# Altium PCB EMG-Arm-ELEC-V1.0.PcbDoc (part 3 of 5)
Units mil, origin at the board's own origin, x right, y up, seen from the top; angles counter-clockwise.
Board outline 8303.83 x 7532.25 mil, 2 copper layers (Top Layer, Bottom Layer), stack 3.556 mil thick; 303 components, 183 nets, 804 pads, 233 vias.
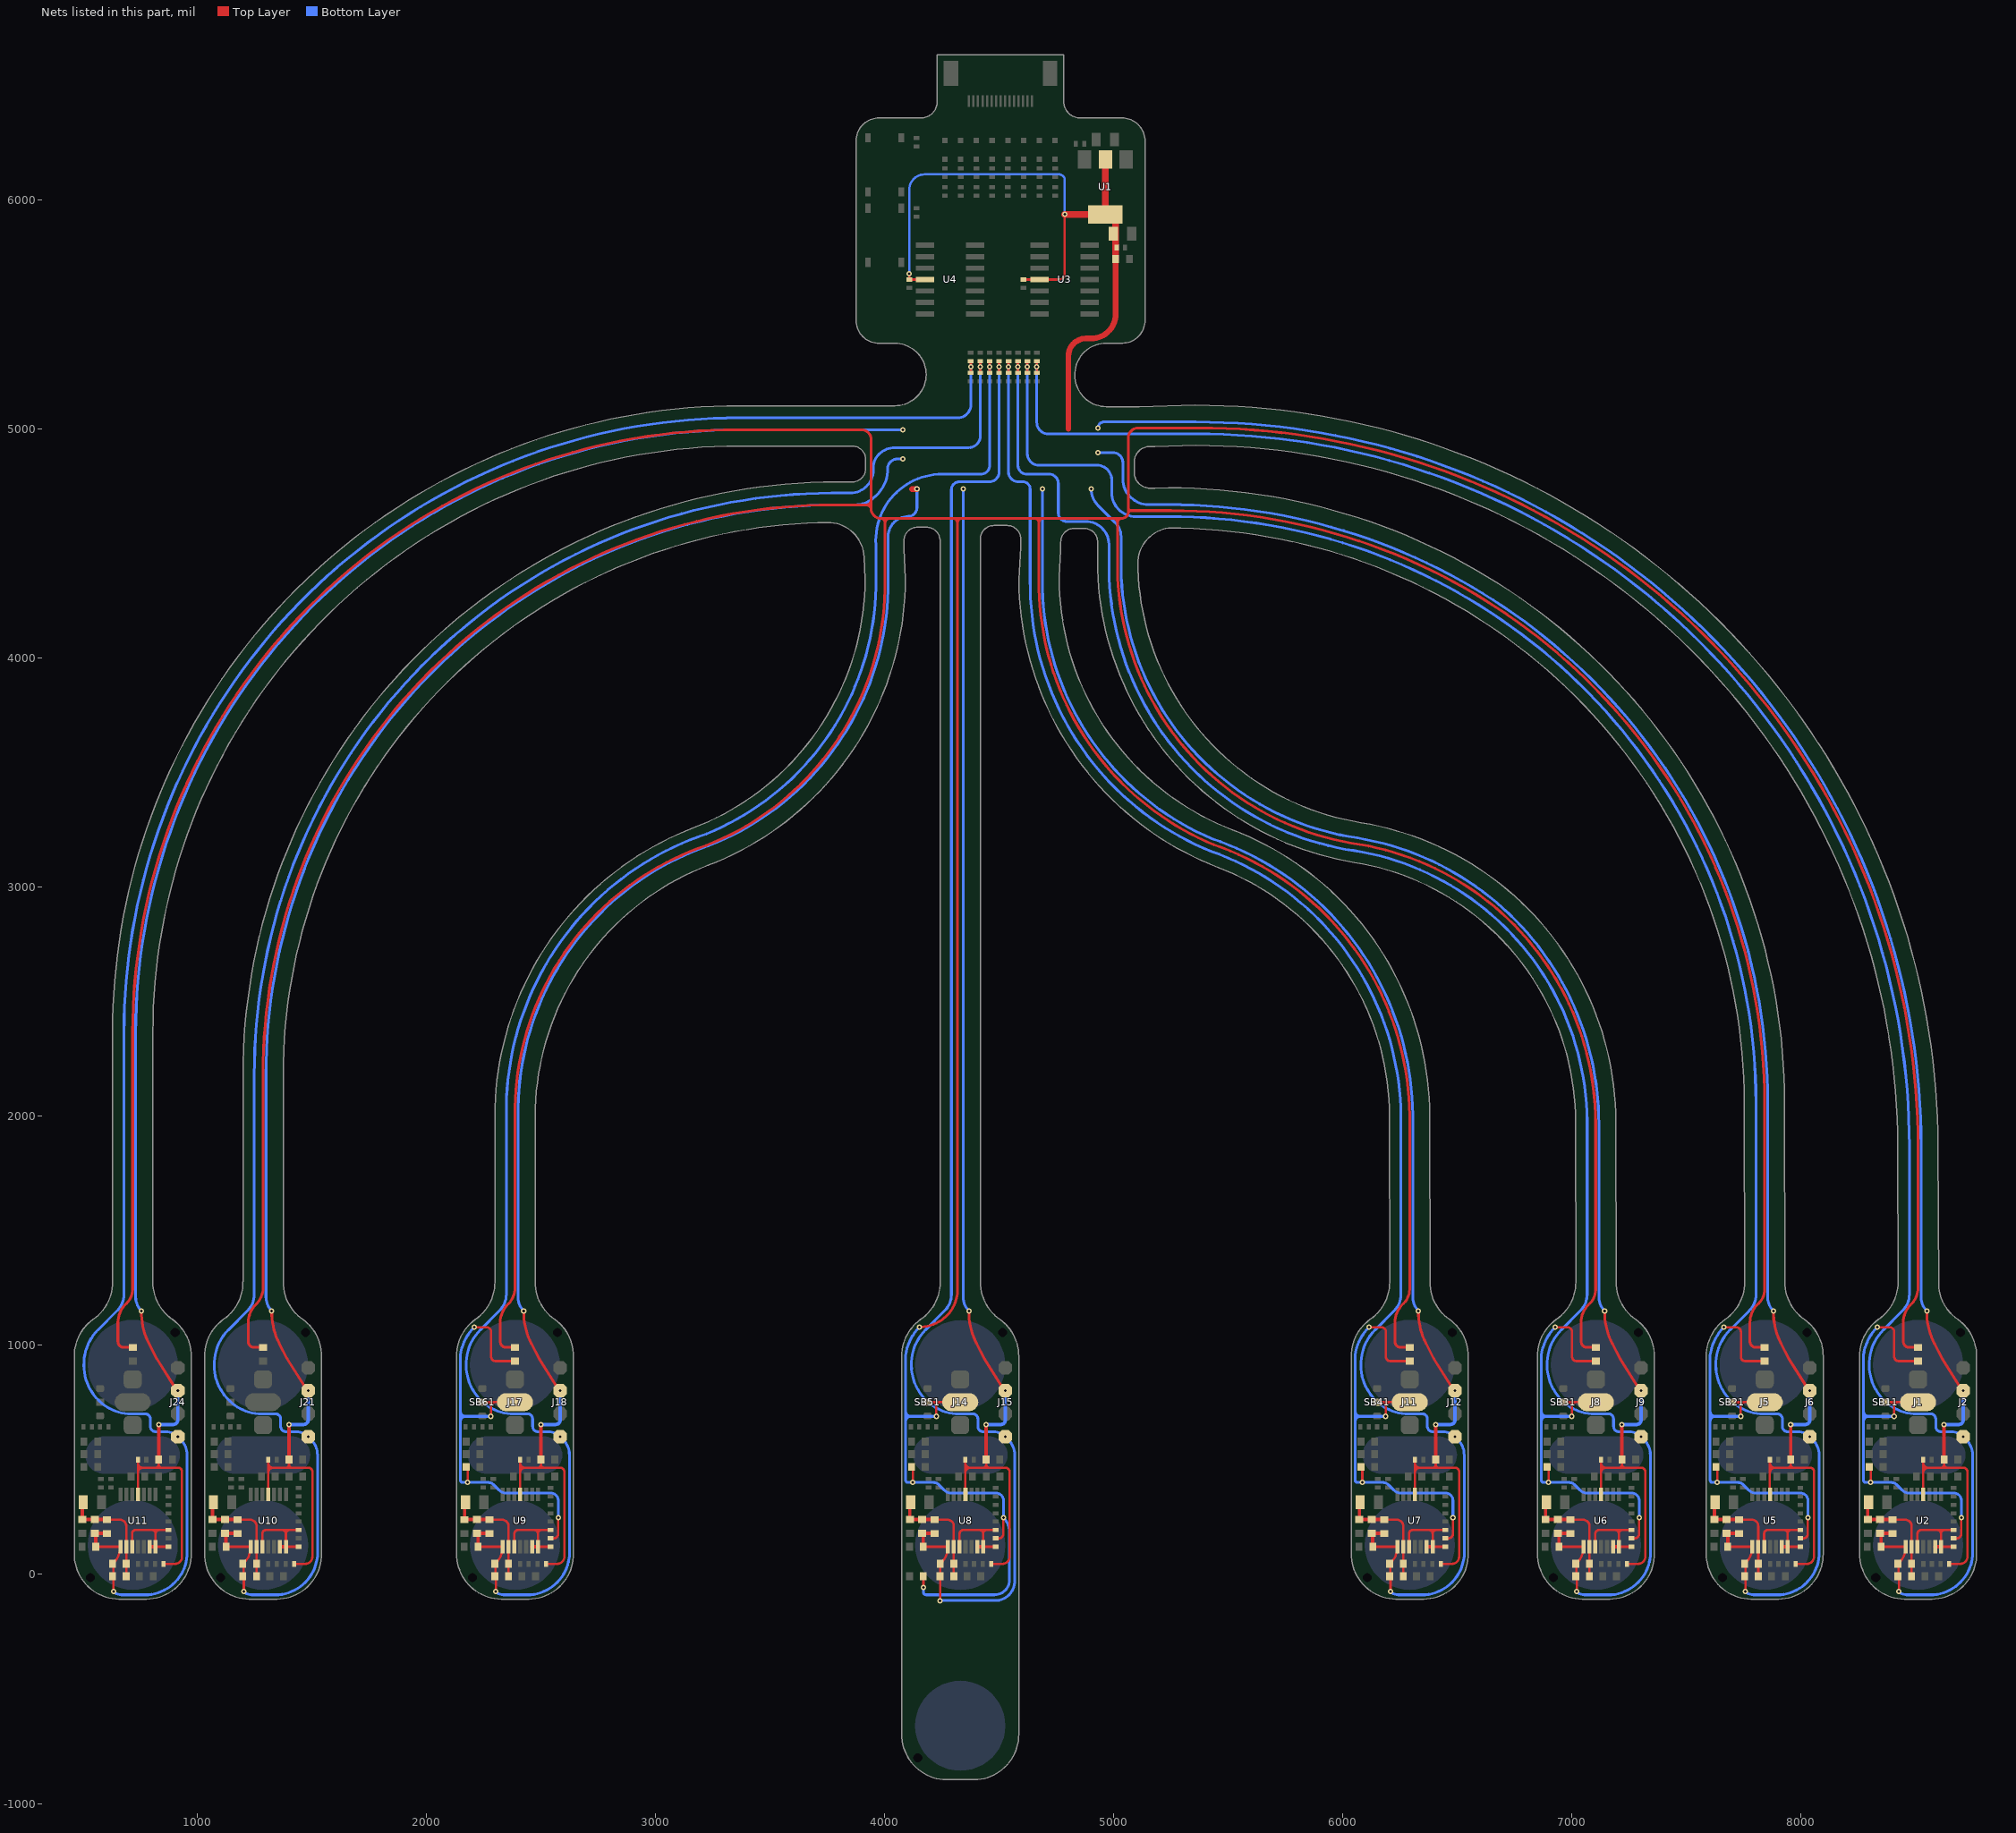
[diagram p2: the nets of this part, all layers, seen from the top]

## Via types
v1: diameter 23.62, hole 11.81, Top Layer to Bottom Layer, tented both sides, 233 vias

## Nets (pads, with @x,y where several pads share a name; then routed paths per layer and width w, separated by ;. In a path a pad name is that pad's centre, name@x,y a point inside that pad or via, vN(x,y) a via of type N, cw(c..) or ccw(c..) an arc to the next point about the centre after c; other vN are vias at no path point)
5V: C1.1 C2.2 C5.2 C6.2 C13.1 C14.1 C15.1 C16.2 C17.2 C24.2 C25.2 C32.2 C33.2 C40.2 C41.2 C48.2 C49.2 C56.2 C57.2 C64.2 C65.2 J2.3 J6.3 J9.3 J12.3 J15.3 J18.3 J21.3 J24.3 R11.2 R34.2 R47.1 R60.1 R73.2 R86.2 R99.2 R112.2 U1.2 U1.4 U2.4 U3.4 U4.4 U5.4 U6.4 U7.4 U8.4 U9.4 U10.4 U11.4 | length 57313.3
  Top Layer w10: C64.2@742.15,501.23 742.15,485.86 ; 742.22,465.79 762.22,465.79 ; U11.4@742.65,349.35 cw(c743.86,350.55) 742.15,350.55 742.15,445.73 ; C65.2@833.09,501.23 833.09,479.45 ; R112.2@854.73,46.32 903.73,46.32 ccw(c903.73,77.54) 934.95,77.54 934.95,449.23 ccw(c918.38,449.23) 918.38,465.79 846.75,465.79 ; C56.2@1311.13,501.23 1311.13,485.86 ; 1311.2,465.79 1331.2,465.79 ; U10.4@1311.63,349.35 cw(c1312.84,350.55) 1311.13,350.55 1311.13,445.73 ; C57.2@1402.06,501.23 1402.06,479.45 ; R99.2@1423.71,46.32 1472.71,46.32 ccw(c1472.71,77.54) 1503.93,77.54 1503.93,449.23 ccw(c1487.36,449.23) 1487.36,465.79 1415.72,465.79 ; C48.2@2410.91,501.23 2410.91,485.86 ; 2410.98,465.79 2430.98,465.79 ; U9.4@2411.41,349.35 cw(c2412.62,350.55) 2410.91,350.55 2410.91,445.73 ; C49.2@2501.85,501.23 2501.85,479.45 ; R86.2@2523.49,46.32 2572.49,46.32 ccw(c2572.49,77.54) 2603.71,77.54 2603.71,449.23 ccw(c2587.14,449.23) 2587.14,465.79 2515.51,465.79 ; v1(4108.98,5679) C15.1@4108.98,5653.82 U4.4@4178.96,5653.82 ; C40.2@4354.4,501.23 4354.4,485.86 ; 4354.47,465.79 4374.47,465.79 ; U8.4@4354.9,349.35 cw(c4356.11,350.55) 4354.4,350.55 4354.4,445.73 ; C41.2@4445.33,501.23 4445.33,479.45 ; R73.2@4466.97,46.32 4515.97,46.32 ccw(c4515.97,77.54) 4547.2,77.54 4547.2,449.23 ccw(c4530.63,449.23) 4530.63,465.79 4458.99,465.79 ; C14.1@4607.02,5653.82 U3.4@4677.98,5653.82 4764.82,5653.82 ccw(c4764.82,5676.99) 4788,5676.99 v1(4788,5937.99) ; C32.2@6316.56,501.23 6316.56,485.86 ; 6316.63,465.79 6336.63,465.79 ; U7.4@6317.06,349.35 cw(c6318.27,350.55) 6316.56,350.55 6316.56,445.73 ; C33.2@6407.49,501.23 6407.49,479.45 ; R60.1@6429.14,46.32 6478.14,46.32 ccw(c6478.14,77.54) 6509.36,77.54 6509.36,449.23 ccw(c6492.79,449.23) 6492.79,465.79 6421.15,465.79 ; C24.2@7129.28,501.22 7129.28,485.86 ; 7129.34,465.79 7149.34,465.79 ; U6.4@7129.78,349.34 cw(c7130.98,350.55) 7129.28,350.55 7129.28,445.72 ; C25.2@7220.21,501.22 7220.21,479.45 ; R47.1@7241.85,46.31 7290.85,46.31 ccw(c7290.85,77.53) 7322.07,77.53 7322.07,449.22 ccw(c7305.5,449.22) 7305.5,465.79 7233.87,465.79 ; C16.2@7866.02,501.23 7866.02,485.86 ; 7866.09,465.79 7886.09,465.79 ; U5.4@7866.52,349.35 cw(c7867.73,350.55) 7866.02,350.55 7866.02,445.73 ; C17.2@7956.96,501.23 7956.96,479.45 ; R34.2@7978.6,46.32 8027.6,46.32 ccw(c8027.6,77.54) 8058.82,77.54 8058.82,449.23 ccw(c8042.25,449.23) 8042.25,465.79 7970.62,465.79 ; C5.2@8535.5,501.22 8535.5,485.86 ; 8535.57,465.79 8555.57,465.79 ; U2.4@8536,349.35 cw(c8537.21,350.55) 8535.5,350.55 8535.5,445.72 ; C6.2@8626.43,501.22 8626.43,479.45 ; R11.2@8648.07,46.32 8697.08,46.32 ccw(c8697.08,77.54) 8728.3,77.54 8728.3,449.22 ccw(c8711.73,449.22) 8711.73,465.79 8640.09,465.79 ; 742.15,445.73 cw(c762.22,445.73) 762.22,465.79 ; 742.15,445.73 742.15,485.86 ; 742.15,485.86 ccw(c762.22,485.86) 762.22,465.79 ; 762.22,465.79 819.43,465.79 ; 819.43,465.79 ccw(c819.43,479.45) 833.09,479.45 ; 819.43,465.79 846.75,465.79 ; 833.09,479.45 ccw(c846.75,479.45) 846.75,465.79 ; 1311.13,445.73 cw(c1331.2,445.73) 1331.2,465.79 ; 1311.13,445.73 1311.13,485.86 ; 1311.13,485.86 ccw(c1331.2,485.86) 1331.2,465.79 ; 1331.2,465.79 1388.4,465.79 ; 1388.4,465.79 ccw(c1388.4,479.45) 1402.06,479.45 ; 1388.4,465.79 1415.72,465.79 ; 1402.06,479.45 ccw(c1415.72,479.45) 1415.72,465.79 ; 2410.91,445.73 cw(c2430.98,445.73) 2430.98,465.79 ; 2410.91,445.73 2410.91,485.86 ; 2410.91,485.86 ccw(c2430.98,485.86) 2430.98,465.79 ; 2430.98,465.79 2488.19,465.79 ; 2488.19,465.79 ccw(c2488.19,479.45) 2501.85,479.45 ; 2488.19,465.79 2515.51,465.79 ; 2501.85,479.45 ccw(c2515.51,479.45) 2515.51,465.79 ; 4354.4,445.73 cw(c4374.47,445.73) 4374.47,465.79 ; 4354.4,445.73 4354.4,485.86 ; 4354.4,485.86 ccw(c4374.47,485.86) 4374.47,465.79 ; 4374.47,465.79 4431.67,465.79 ; 4431.67,465.79 ccw(c4431.67,479.45) 4445.33,479.45 ; 4431.67,465.79 4458.99,465.79 ; 4445.33,479.45 ccw(c4458.99,479.45) 4458.99,465.79 ; 6316.56,445.73 cw(c6336.63,445.73) 6336.63,465.79 ; 6316.56,445.73 6316.56,485.86 ; 6316.56,485.86 ccw(c6336.63,485.86) 6336.63,465.79 ; 6336.63,465.79 6393.83,465.79 ; 6393.83,465.79 ccw(c6393.83,479.45) 6407.49,479.45 ; 6393.83,465.79 6421.15,465.79 ; 6407.49,479.45 ccw(c6421.15,479.45) 6421.15,465.79 ; 7129.28,445.72 cw(c7149.34,445.72) 7149.34,465.79 ; 7129.28,445.72 7129.28,485.86 ; 7129.28,485.86 ccw(c7149.34,485.86) 7149.34,465.79 ; 7149.34,465.79 7206.55,465.79 ; 7206.55,465.79 ccw(c7206.55,479.45) 7220.21,479.45 ; 7206.55,465.79 7233.87,465.79 ; 7220.21,479.45 ccw(c7233.87,479.45) 7233.87,465.79 ; 7866.02,445.73 cw(c7886.09,445.73) 7886.09,465.79 ; 7866.02,445.73 7866.02,485.86 ; 7866.02,485.86 ccw(c7886.09,485.86) 7886.09,465.79 ; 7886.09,465.79 7943.3,465.79 ; 7943.3,465.79 ccw(c7943.3,479.45) 7956.96,479.45 ; 7943.3,465.79 7970.62,465.79 ; 7956.96,479.45 ccw(c7970.62,479.45) 7970.62,465.79 ; 8535.5,445.72 cw(c8555.57,445.72) 8555.57,465.79 ; 8535.5,445.72 8535.5,485.86 ; 8535.5,485.86 ccw(c8555.57,485.86) 8555.57,465.79 ; 8555.57,465.79 8612.77,465.79 ; 8612.77,465.79 ccw(c8612.77,479.45) 8626.43,479.45 ; 8612.77,465.79 8640.09,465.79 ; 8626.43,479.45 ccw(c8640.09,479.45) 8640.09,465.79
  Top Layer w12: 824.46,942.77 790.59,1008.54 789.91,1009.86 cw(c1052.35,1143.43) 763.89,1084.21 cw(c1095.88,1150.66) v1@757.31,1150.66 ; 824.69,942.32 900.42,821.57 v1(916.65,802) ; 1393.43,942.77 1359.56,1008.54 1358.88,1009.87 cw(c1621.33,1143.43) 1332.87,1084.21 cw(c1664.86,1150.66) v1@1326.28,1150.66 ; 1393.66,942.32 1469.4,821.57 v1(1485.63,802) ; 2493.22,942.77 2459.35,1008.54 2458.67,1009.86 cw(c2721.11,1143.43) 2432.65,1084.21 cw(c2764.64,1150.66) v1@2426.07,1150.66 ; 2493.45,942.32 2569.18,821.57 v1(2585.41,802) ; 4436.7,942.77 4402.83,1008.54 4402.15,1009.87 cw(c4664.6,1143.43) 4376.14,1084.21 cw(c4708.12,1150.66) v1@4369.55,1150.66 ; 4436.93,942.32 4512.67,821.57 v1(4528.9,802) ; 6398.86,942.77 6365,1008.54 6364.32,1009.87 cw(c6626.76,1143.43) 6338.3,1084.21 cw(c6670.29,1150.66) v1@6331.72,1150.66 ; 6399.1,942.32 6474.83,821.57 v1(6491.06,802) ; 7211.58,942.76 7177.71,1008.53 7177.03,1009.86 cw(c7439.47,1143.42) 7151.01,1084.2 cw(c7483,1150.65) v1@7144.43,1150.65 ; 7211.81,942.31 7287.54,821.57 v1(7303.78,801.99) ; 7948.33,942.77 7914.46,1008.54 7913.78,1009.87 cw(c8176.22,1143.43) 7887.76,1084.21 cw(c8219.75,1150.66) v1@7881.18,1150.66 ; 7948.56,942.32 8024.29,821.57 v1(8040.53,802) ; 8617.8,942.77 8583.93,1008.54 8583.25,1009.86 cw(c8845.7,1143.43) 8557.24,1084.21 cw(c8889.23,1150.66) v1@8550.65,1150.66 ; 8618.03,942.32 8693.77,821.57 v1(8710,802) ; v1@757.31,1150.66 v1(757.52,1150.98) v1@757.31,1150.66 ; v1@1326.28,1150.66 v1(1326.49,1150.98) v1@1326.28,1150.66 ; v1@2426.07,1150.66 v1(2426.28,1150.98) v1@2426.07,1150.66 ; v1@4369.55,1150.66 v1(4369.76,1150.98) v1@4369.55,1150.66 ; v1@6331.72,1150.66 v1(6331.93,1150.98) v1@6331.72,1150.66 ; v1@7144.43,1150.65 v1(7144.64,1150.97) v1@7144.43,1150.65 ; v1@7881.18,1150.66 v1(7881.39,1150.98) v1@7881.18,1150.66 ; v1@8550.65,1150.66 v1(8550.86,1150.98) v1@8550.65,1150.66
  Top Layer w15: C65.2@833.09,501.23 v1(833.09,654.8) ; C57.2@1402.06,501.23 v1(1402.06,654.8) ; C49.2@2501.85,501.23 v1(2501.85,654.8) ; C41.2@4445.33,501.23 v1(4445.33,654.8) ; C33.2@6407.49,501.23 v1(6407.49,654.8) ; C25.2@7220.21,501.22 v1(7220.21,654.8) ; C17.2@7956.96,501.23 v1(7956.96,654.8) ; C6.2@8626.43,501.22 v1(8626.43,654.8)
  Top Layer w25: 4120.95,4738.95 v1(4142.9,4738.95) ; 4804.06,5002.7 4804.06,5319.71 cw(c4880.98,5319.71) 4880.98,5396.64 4903.82,5396.64 ccw(c4903.82,5503.09) 5010.26,5503.09 C13.1@5010.26,5743.82
  Top Layer w30: v1(4788,5937.99) U1.4@4965.45,5937.99 ; U1.2@4965.45,6178.15 U1.4@4965.45,5937.99 ; C13.1@5010.26,5743.82 5010.26,5893.17 ccw(c4965.45,5893.17) 5009.02,5903.66 ccw(c4965.45,5893.17) 5003.64,5916.63 ccw(c4965.45,5893.17) U1.4@4965.45,5937.99
  Bottom Layer w10: v1(4108.98,5679) 4108.98,6044.98 cw(c4177,6044.98) 4177,6113 4763,6113 cw(c4763,6088) 4788,6088 v1(4788,5937.99)
  Bottom Layer w12: 732.71,1210.88 ccw(c817.42,1210.88) v1(757.52,1150.98) cw(c817.8,1211.25) 732.55,1211.25 732.55,2365.89 cw(c3366.65,2363.78) 3368.75,4997.89 v1(4080.91,4997.89) ; 1301.68,1210.88 ccw(c1386.4,1210.88) v1(1326.49,1150.98) cw(c1386.77,1211.25) 1301.53,1211.25 1301.53,2181.3 cw(c3787.43,2183.98) 3784.75,4669.89 3871.68,4669.89 ccw(c3871.73,4796.56) 3961.09,4706.78 3963.04,4708.55 ccw(c3856.12,4826.3) 4015.16,4827.66 4015.15,4828.24 cw(c4057.11,4828.15) 4057.11,4870.11 v1(4080.91,4870.11) ; 2401.47,1210.88 ccw(c2486.18,1210.88) v1(2426.28,1150.98) cw(c2486.03,1210.73) 2401.53,1210.73 2401.53,2001.92 cw(c3631.61,2017.77) 3234.68,3182.17 ccw(c2786.44,4328.26) 4017.05,4335.57 4017.05,4531.37 cw(c4105.33,4531.37) 4042.9,4593.8 cw(c4105.18,4531.52) 4105.18,4619.59 ccw(c4105.18,4657.31) 4142.9,4657.31 v1(4142.9,4738.95) v1@4142.9,4740 ; v1(4344.55,4738.95) 4344.55,4548.26 4344.55,1342 4344.55,1211.84 ccw(c4430.63,1211.84) v1(4369.76,1150.98) ; v1(4689.91,4738.95) 4689.91,4340.33 ccw(c5908.55,4333.6) 5430.45,3212.65 cw(c5019.36,1992.25) 6307.05,2006.84 6307.05,1211.03 ccw(c6391.98,1211.03) v1(6331.93,1150.98) cw(c6391.83,1210.88) 6307.11,1210.88 ; v1@4903,4739.67 ccw(c5003,4739.67) 4932.29,4668.96 5008.49,4592.76 cw(c4947.26,4531.53) 5033.85,4531.53 5033.85,4429.04 ccw(c6241.8,4410.74) 6027.37,3221.83 cw(c5857.62,1974.06) 6806.44,2802 cw(c5849.48,1966.95) 7119.55,1966.13 7119.55,1211.54 ; v1(4933,4898) 4997.83,4898 cw(c4997.83,4854.05) 5041.77,4854.05 5041.77,4782.16 ; v1(4933,5005.89) cw(c4959,5005.89) 4959,5031.89 5359.75,5031.89 cw(c5361.9,1867.74) 8526.05,1869.89 8526.05,1210.88 ccw(c8610.77,1210.88) v1(8550.86,1150.98) ; 5041.77,4782.11 ccw(c5148.77,4782.11) 5073,4706.55 5077.33,4702.23 ccw(c5152.99,4777.89) 5152.99,4670.89 5153.06,4670.89 5240.75,4670.89 cw(c5243.15,2057.49) 7856.55,2059.89 7856.55,1210.94 ; 7119.83,1210.87 ccw(c7204.54,1210.87) v1(7144.64,1150.97) ; 7856.58,1210.88 ccw(c7941.29,1210.88) v1(7881.39,1150.98)
  Bottom Layer w15: v1(833.09,654.8) 896.52,654.8 ccw(c896.52,674.94) 916.65,674.94 v1(916.65,802) ; v1(1402.06,654.8) 1465.49,654.8 ccw(c1465.49,674.94) 1485.63,674.94 v1(1485.63,802) ; v1(2501.85,654.8) 2565.28,654.8 ccw(c2565.28,674.94) 2585.41,674.94 v1(2585.41,802) ; v1(4445.33,654.8) 4508.76,654.8 ccw(c4508.76,674.94) 4528.9,674.94 v1(4528.9,802) ; v1(6407.49,654.8) 6470.93,654.8 ccw(c6470.93,674.94) 6491.06,674.94 v1(6491.06,802) ; v1(7220.21,654.8) 7283.64,654.8 ccw(c7283.64,674.93) 7303.78,674.93 v1(7303.78,801.99) ; v1(7956.96,654.8) 8020.39,654.8 ccw(c8020.39,674.94) 8040.53,674.94 v1(8040.53,802) ; v1(8626.43,654.8) 8689.86,654.8 ccw(c8689.86,674.94) 8710,674.94 v1(8710,802)
  other v1: 4903,4738.95
ampRef: R6.2 R12.1 U2.10 U2.13 U2.14 | length 411.5
  Top Layer w10: U2.10@8510.41,121 8510.41,178.78 cw(c8525.78,178.78) 8525.78,194.14 8628.04,194.14 ; 8597.51,194.14 cw(c8597.51,178.87) 8612.77,178.87 cw(c8628.04,178.87) 8628.04,194.14 ; U2.14@8612.77,121 R12.1@8668.35,121 ; U2.14@8612.77,131 8612.77,188.87 ; R6.2@8668.35,194.14 8628.04,194.14
  Top Layer w15: U2.13@8587.18,121 U2.14@8612.77,121
ampRef_2: R29.2 R35.1 U5.10 U5.13 U5.14 | length 411.5
  Top Layer w10: U5.10@7840.93,121 7840.93,178.78 cw(c7856.3,178.78) 7856.3,194.14 7958.56,194.14 ; 7928.03,194.14 cw(c7928.03,178.88) 7943.3,178.88 cw(c7958.56,178.88) 7958.56,194.14 ; U5.14@7943.3,121 R35.1@7998.87,121 ; U5.14@7943.3,131 7943.3,188.88 ; R29.2@7998.87,194.14 7958.56,194.14
  Top Layer w15: U5.13@7917.71,121 U5.14@7943.3,121
ampRef_3: R42.1 R48.2 U6.10 U6.13 U6.14 | length 411.5
  Top Layer w10: U6.10@7104.19,120.99 7104.19,178.77 cw(c7119.55,178.77) 7119.55,194.14 7221.81,194.14 ; 7191.28,194.14 cw(c7191.28,178.87) 7206.55,178.87 cw(c7221.81,178.87) 7221.81,194.14 ; U6.14@7206.55,120.99 R48.2@7262.12,120.99 ; U6.14@7206.55,130.99 7206.55,188.87 ; R42.1@7262.12,194.14 7221.81,194.14
  Top Layer w15: U6.13@7180.96,120.99 U6.14@7206.55,120.99
ampRef_4: R55.2 R61.1 U7.10 U7.13 U7.14 | length 411.5
  Top Layer w10: U7.10@6291.47,121 6291.47,178.78 cw(c6306.84,178.78) 6306.84,194.14 6409.1,194.14 ; 6378.57,194.14 cw(c6378.57,178.88) 6393.83,178.88 cw(c6409.1,178.88) 6409.1,194.14 ; U7.14@6393.83,121 R61.1@6449.41,121 ; U7.14@6393.83,131 6393.83,188.88 ; R55.2@6449.41,194.14 6409.1,194.14
  Top Layer w15: U7.13@6368.24,121 U7.14@6393.83,121
ampRef_5: R68.2 R74.1 U8.10 U8.13 U8.14 | length 411.5
  Top Layer w10: U8.10@4329.31,121 4329.31,178.78 cw(c4344.67,178.78) 4344.67,194.14 4446.94,194.14 ; 4416.4,194.14 cw(c4416.4,178.88) 4431.67,178.88 cw(c4446.94,178.88) 4446.94,194.14 ; U8.14@4431.67,121 R74.1@4487.25,121 ; U8.14@4431.67,131 4431.67,188.88 ; R68.2@4487.25,194.14 4446.94,194.14
  Top Layer w15: U8.13@4406.08,121 U8.14@4431.67,121
ampRef_6: R81.2 R87.1 U9.10 U9.13 U9.14 | length 411.5
  Top Layer w10: U9.10@2385.82,121 2385.82,178.78 cw(c2401.19,178.78) 2401.19,194.14 2503.45,194.14 ; 2472.92,194.14 cw(c2472.92,178.88) 2488.19,178.88 cw(c2503.45,178.88) 2503.45,194.14 ; U9.14@2488.19,121 R87.1@2543.76,121 ; U9.14@2488.19,131 2488.19,188.88 ; R81.2@2543.76,194.14 2503.45,194.14
  Top Layer w15: U9.13@2462.6,121 U9.14@2488.19,121
ampRef_7: R94.2 R100.1 U10.10 U10.13 U10.14 | length 411.5
  Top Layer w10: U10.10@1286.04,121 1286.04,178.78 cw(c1301.41,178.78) 1301.41,194.14 1403.67,194.14 ; 1373.14,194.14 cw(c1373.14,178.88) 1388.4,178.88 cw(c1403.67,178.88) 1403.67,194.14 ; U10.14@1388.4,121 R100.1@1443.98,121 ; U10.14@1388.4,131 1388.4,188.88 ; R94.2@1443.98,194.14 1403.67,194.14
  Top Layer w15: U10.13@1362.81,121 U10.14@1388.4,121
ampRef_8: R107.2 R113.1 U11.10 U11.13 U11.14 | length 411.5
  Top Layer w10: U11.10@717.06,121 717.06,178.78 cw(c732.43,178.78) 732.43,194.14 834.69,194.14 ; 804.16,194.14 cw(c804.16,178.88) 819.43,178.88 cw(c834.69,178.88) 834.69,194.14 ; U11.14@819.43,121 R113.1@875,121 ; U11.14@819.43,131 819.43,188.88 ; R107.2@875,194.14 834.69,194.14
  Top Layer w15: U11.13@793.84,121 U11.14@819.43,121
bpfIN: C8.1 C9.1 C10.2 C11.2 R8.1 R9.1 U2.9 | length 483.8
  Top Layer w10: R8.1@8401.04,238.87 8456.9,238.87 cw(c8456.9,210.96) 8484.82,210.96 U2.9@8484.82,121 R9.1@8484.82,46 C10.2@8484.82,-3
  Top Layer w15: C11.2@8293.04,301.44 C8.1@8293.04,239.87 C9.1@8347.04,239.87 8400.04,239.87 cw(c8400.04,238.87) R8.1@8401.04,238.87
bpfIN_2: C19.1 C20.1 C21.2 C22.2 R31.1 R32.1 U5.9 | length 483.8
  Top Layer w10: R31.1@7731.56,238.88 7787.43,238.88 cw(c7787.43,210.96) 7815.34,210.96 U5.9@7815.34,121 R32.1@7815.34,46 C21.2@7815.34,-3
  Top Layer w15: C22.2@7623.56,301.45 C19.1@7623.56,239.88 C20.1@7677.56,239.88 7730.56,239.88 cw(c7730.56,238.88) R31.1@7731.56,238.88
bpfIN_3: C27.1 C28.1 C29.2 C30.2 R44.1 R45.1 U6.9 | length 483.8
  Top Layer w10: R44.1@6994.8,238.87 7050.68,238.87 cw(c7050.68,210.95) 7078.59,210.95 U6.9@7078.59,120.99 R45.1@7078.59,45.99 C29.2@7078.59,-3.01
  Top Layer w15: C30.2@6886.81,301.44 C27.1@6886.81,239.87 6940.81,239.87 6993.81,239.87 cw(c6993.81,238.87) R44.1@6994.8,238.87
bpfIN_4: C35.1 C36.1 C37.2 C38.2 R57.1 R58.1 U7.9 | length 483.8
  Top Layer w10: R57.1@6182.1,238.88 6237.97,238.88 cw(c6237.97,210.96) 6265.88,210.96 U7.9@6265.88,121 R58.1@6265.88,46 C37.2@6265.88,-3
  Top Layer w15: C38.2@6074.1,301.44 C35.1@6074.1,239.88 C36.1@6128.1,239.88 6181.1,239.88 cw(c6181.1,238.88) R57.1@6182.1,238.88
bpfIN_5: C43.1 C44.1 C45.2 C46.2 R70.1 R71.1 U8.9 | length 483.8
  Top Layer w10: R70.1@4219.94,238.88 4275.8,238.88 cw(c4275.8,210.96) 4303.72,210.96 U8.9@4303.72,121 4303.72,46 C45.2@4303.72,-3
  Top Layer w15: C46.2@4111.94,301.45 C43.1@4111.94,239.88 C44.1@4165.94,239.88 4218.94,239.88 cw(c4218.94,238.88) R70.1@4219.94,238.88
bpfIN_6: C51.1 C52.1 C53.2 C54.2 R83.1 R84.1 U9.9 | length 483.8
  Top Layer w10: R83.1@2276.45,238.88 2332.32,238.88 cw(c2332.32,210.96) 2360.23,210.96 U9.9@2360.23,121 R84.1@2360.23,46 C53.2@2360.23,-3
  Top Layer w15: C54.2@2168.45,301.44 2168.45,239.88 C52.1@2222.45,239.88 2275.45,239.88 cw(c2275.45,238.88) R83.1@2276.45,238.88
bpfIN_7: C59.1 C60.1 C61.2 C62.2 R96.1 R97.1 U10.9 | length 483.8
  Top Layer w10: R96.1@1176.67,238.88 1232.54,238.88 cw(c1232.54,210.96) 1260.45,210.96 U10.9@1260.45,121 R97.1@1260.45,46 C61.2@1260.45,-3
  Top Layer w15: C62.2@1068.67,301.45 C59.1@1068.67,239.88 C60.1@1122.67,239.88 1175.67,239.88 cw(c1175.67,238.88) R96.1@1176.67,238.88
bpfIN_8: C67.1 C68.1 C69.2 C70.2 R109.1 R110.1 U11.9 | length 483.8
  Top Layer w10: R109.1@607.69,238.88 663.56,238.88 cw(c663.56,210.96) 691.47,210.96 U11.9@691.47,121 R110.1@691.47,46 C69.2@691.47,-3
  Top Layer w15: C70.2@499.69,301.44 C67.1@499.69,239.88 C68.1@553.69,239.88 606.69,239.88 cw(c606.69,238.88) R109.1@607.69,238.88
bpfOUT: C9.2 C10.1 J2.1 R8.2 R9.2 SB01.1 SB12.2 SB101.1 U2.8 | length 8900.5
  Top Layer w10: SB12.2@8351.55,121 U2.8@8459.23,121 cw(c8361.23,121) 8458.35,107.93 cw(c8361.23,121) 8442.38,66.06 cw(c8361.23,121) 8430.53,51.71 R9.2@8424.82,46 8428.49,42.33 8428.49,0.67 8424.82,-3 8429,-7.18 v1(8429,-75)
  Top Layer w11: SB101.1@4666.06,5246.85 v1(4666.06,5272.1) SB01.1@4666.06,5297.35
  Top Layer w15: SB12.2@8351.55,121 8351.55,175.36 C9.2@8347.04,179.87 8400.04,179.87 cw(c8400.04,178.87) R8.2@8401.04,178.87
  Bottom Layer w12: v1(4666.06,5272.1) 4666.06,5029.94 ccw(c4716.11,5029.94) 4716.11,4979.89 5359.75,4979.89 cw(c5362.31,1867.33) 8474.87,1869.89 8474.87,1222.55 cw(c8374.87,1222.55) 8445.58,1151.84 8361.56,1067.81 ccw(c8510.2,919.07) 8300,913.16 ccw(c8509.51,911.71) 8366.53,758.56 8367.76,757.35 ccw(c8505.54,896.97) 8492.74,701.24 8493.14,701.24 8567.59,701.24 cw(c8567.59,678.83) 8590,678.83 8590,645.71 ccw(c8612.2,645.71) 8612.2,623.51 8658.06,623.51 cw(c8658.06,550.06) v1(8710,602) 8722.39,589.61 cw(c8654.23,521.45) 8750.63,521.45 8750.63,82.42 cw(c8564.6,96.79) 8581.73,-89 8462.8,-89 cw(c8462.8,-41.2) v1(8429,-75)
bpfOUT_2: C20.2 C21.1 J6.1 R31.2 R32.2 SB02.1 SB22.2 SB102.1 U5.8 | length 8436
  Top Layer w10: SB22.2@7682.07,121 U5.8@7789.75,121 cw(c7691.76,121) 7788.88,107.93 cw(c7691.76,121) 7772.9,66.06 cw(c7691.76,121) 7761.05,51.71 R32.2@7755.34,46 7759.01,42.33 7759.01,0.67 7755.34,-3 7759.53,-7.18 v1(7759.53,-75)
  Top Layer w11: SB102.1@4624.92,5246.85 v1(4624.92,5272.1) SB02.1@4624.92,5297.35
  Top Layer w15: SB22.2@7682.07,121 7682.07,175.36 C20.2@7677.56,179.88 7730.56,179.88 cw(c7730.56,178.88) R31.2@7731.56,178.88
  Bottom Layer w12: v1(4624.92,5272.1) 4624.92,4893.08 ccw(c4675,4893.08) 4675,4843 4929.3,4843 cw(c4929.3,4779.3) 4993,4779.3 4993,4723.98 ccw(c5098.09,4723.98) 5098.09,4618.89 5240.75,4618.89 cw(c5243.56,2057.08) 7805.37,2059.89 7805.37,1222.52 cw(c7705.37,1222.52) 7776.1,1151.84 ; v1(7759.53,-75) ccw(c7793.32,-41.2) 7793.32,-89 7912.25,-89 ccw(c7895.12,96.8) 8081.15,82.42 8081.15,521.45 ccw(c7984.75,521.45) 8052.92,589.61 v1(8040.53,602) ccw(c7988.58,550.06) 7988.58,623.52 7942.72,623.52 cw(c7942.72,645.71) 7920.53,645.71 7920.53,678.83 ccw(c7898.12,678.83) 7898.12,701.24 7823.67,701.24 7823.27,701.24 cw(c7836.06,896.97) 7698.29,757.35 7697.06,758.56 cw(c7840.03,911.71) 7630.53,913.16 cw(c7840.73,919.08) 7692.08,1067.81 7776.08,1151.81
bpfOUT_3: C28.2 C29.1 J9.1 R44.2 R45.2 SB03.1 SB32.2 SB103.1 U6.8 | length 7810.5
  Top Layer w10: SB32.2@6945.32,121 U6.8@7053,120.99 cw(c6955.01,120.99) 7052.13,107.92 cw(c6955.01,120.99) 7036.15,66.05 cw(c6955.01,120.99) 7024.3,51.7 R45.2@7018.59,45.99 7022.26,42.33 7022.26,0.66 7018.59,-3.01 7022.78,-7.19 v1(7022.78,-75.01)
  Top Layer w11: SB103.1@4583.78,5246.85 v1(4583.78,5272.1) SB03.1@4583.78,5297.35
  Top Layer w15: SB32.2@6945.32,121 6945.32,175.36 6940.81,179.87 6993.81,179.87 cw(c6993.81,178.87) R44.2@6994.8,178.87
  Bottom Layer w12: v1(4583.78,5272.1) 4583.78,4842.69 ccw(c4622.47,4842.69) 4622.47,4804 4720,4804 cw(c4720,4763.99) 4760.01,4763.99 4760.01,4634 ccw(c4796.27,4634) 4796.27,4597.75 4879.1,4597.75 4879.17,4597.75 cw(c4879.12,4495.47) 4981.36,4498.01 4981.36,4497.85 4981.36,4427.47 ccw(c6238.5,4403.14) 6012.91,3166.17 cw(c5859.03,1966.59) 7068.37,1979.85 7068.37,1341.99 7068.37,1221.87 cw(c6969.31,1221.87) 7039.36,1151.83 6955.33,1067.81 ccw(c7103.98,919.07) 6893.78,913.15 ccw(c7103.29,911.7) 6960.31,758.56 6961.54,757.35 ccw(c7099.31,896.97) 7086.52,701.23 7086.92,701.23 7161.37,701.23 cw(c7161.37,678.82) 7183.78,678.82 7183.78,645.71 ccw(c7205.97,645.71) 7205.97,623.51 7251.83,623.51 cw(c7251.83,550.05) v1(7303.78,601.99) 7316.17,589.6 cw(c7248.01,521.44) 7344.4,521.44 7344.4,82.41 cw(c7158.37,96.79) 7175.5,-89.01 7056.58,-89.01 cw(c7056.58,-41.21) v1(7022.78,-75.01)
bpfOUT_4: C36.2 C37.1 J12.1 R57.2 R58.2 SB04.1 SB42.2 SB104.1 U7.8 | length 7198
  Top Layer w10: SB42.2@6132.61,121 U7.8@6240.29,121 cw(c6142.3,121) 6239.42,107.93 cw(c6142.3,121) 6223.44,66.06 cw(c6142.3,121) 6211.59,51.71 R58.2@6205.88,46 6209.55,42.33 6209.55,0.67 6205.88,-3 6210.06,-7.18 v1(6210.06,-75)
  Top Layer w11: SB104.1@4542.64,5246.85 v1(4542.64,5272.1) SB04.1@4542.64,5297.35
  Top Layer w15: SB42.2@6132.61,121 6132.61,175.36 C36.2@6128.1,179.88 6181.1,179.88 cw(c6181.1,178.88) R57.2@6182.1,178.88
  Bottom Layer w12: v1(4542.64,5272.1) 4542.64,4813.71 ccw(c4585.35,4813.71) 4585.35,4771 4605,4771 cw(c4605,4738.95) 4637.05,4738.95 4637.05,4341.07 ccw(c5899.7,4328.41) 5429.26,3156.6 cw(c5014.32,1986.34) 6255.87,2001.9 6255.87,1222.39 cw(c6156.08,1222.39) 6226.64,1151.84 6142.62,1067.81 ccw(c6291.26,919.08) 6081.07,913.16 ccw(c6290.57,911.71) 6147.6,758.56 6148.82,757.35 ccw(c6286.6,896.97) 6273.81,701.24 6274.2,701.24 6348.66,701.24 cw(c6348.66,678.83) 6371.06,678.83 6371.06,645.71 ccw(c6393.26,645.71) 6393.26,623.52 6439.12,623.52 cw(c6439.12,550.06) v1(6491.06,602) 6503.46,589.61 cw(c6435.29,521.45) 6531.69,521.45 6531.69,82.42 cw(c6345.66,96.8) 6362.79,-89 6243.86,-89 cw(c6243.86,-41.2) v1(6210.06,-75)
bpfOUT_5: C44.2 C45.1 J15.1 R70.2 R71.2 SB05.1 SB52.2 SB105.1 U8.8 | length 6725.7
  Top Layer w10: SB52.2@4170.45,121 U8.8@4278.13,121 cw(c4180.13,121) 4277.25,107.93 cw(c4180.13,121) 4261.28,66.06 cw(c4180.13,121) 4249.42,51.71 4243.72,46 C45.1@4243.72,-8 4243.72,-112.48 v1@4243.38,-112.82
  Top Layer w11: SB105.1@4501.49,5246.85 v1(4501.49,5272.1) SB05.1@4501.49,5297.35
  Top Layer w15: SB52.2@4170.45,121 4170.45,175.36 C44.2@4165.94,179.88 4218.94,179.88 cw(c4218.94,178.88) R70.2@4219.94,178.88
  Bottom Layer w12: v1(4243.38,-114.82) 4244.2,-114 4492.41,-114 ; 4492.46,-114 ccw(c4492.41,-102) 4493.63,-113.94 ccw(c4484.66,-29.33) 4569.49,-35.81 ccw(c4557.52,-34.96) 4569.52,-34.96 4569.52,521.45 ccw(c4473.13,521.45) 4541.29,589.61 v1(4528.9,602) ccw(c4476.96,550.06) 4476.96,623.52 4431.1,623.52 cw(c4431.1,645.71) 4408.9,645.71 4408.9,678.83 ccw(c4386.49,678.83) 4386.49,701.24 4312.04,701.24 4311.64,701.24 cw(c4324.44,896.97) 4186.66,757.35 4185.43,758.56 cw(c4328.41,911.71) 4118.9,913.16 cw(c4329.1,919.08) 4180.46,1067.81 4264.48,1151.84 ccw(c4194.73,1221.58) 4293.37,1221.58 4293.37,1342 4293.37,4537.65 4293.37,4736.31 cw(c4327.49,4736.31) 4327.49,4770.43 4458.78,4770.43 ccw(c4458.78,4813.14) 4501.49,4813.14 ; 4501.49,4813.71 v1(4501.49,5272.1)
bpfOUT_6: C52.2 C53.1 J18.1 R83.2 R84.2 SB06.1 SB62.2 SB106.1 U9.8 | length 7495.5
  Top Layer w10: SB62.2@2226.96,121 U9.8@2334.64,121 cw(c2236.65,121) 2333.77,107.93 cw(c2236.65,121) 2317.79,66.06 cw(c2236.65,121) 2305.94,51.71 R84.2@2300.23,46 2303.9,42.33 2303.9,0.67 2300.23,-3 2304.41,-7.18 v1(2304.41,-75)
  Top Layer w11: SB106.1@4460.35,5246.85 v1(4460.35,5272.1) SB06.1@4460.35,5297.35
  Top Layer w15: SB62.2@2226.96,121 2226.96,175.36 C52.2@2222.45,179.88 2275.45,179.88 cw(c2275.45,178.88) R83.2@2276.45,178.88
  Bottom Layer w12: v1(2304.41,-75) ccw(c2338.21,-41.2) 2338.21,-89 2457.14,-89 ccw(c2440.01,96.8) 2626.04,82.42 2626.04,521.45 ccw(c2529.64,521.45) 2597.81,589.61 v1(2585.41,602) ccw(c2533.47,550.06) 2533.47,623.52 2487.61,623.52 cw(c2487.61,645.71) 2465.41,645.71 2465.41,678.83 ccw(c2443.01,678.83) 2443.01,701.24 2368.56,701.24 2368.16,701.24 cw(c2380.95,896.97) 2243.18,757.35 2241.95,758.56 cw(c2384.92,911.71) 2175.42,913.16 cw(c2385.62,919.08) 2236.97,1067.81 2321.06,1151.9 ccw(c2250.35,1222.61) 2350.35,1222.61 2350.35,2004.95 cw(c3627.99,2021.18) 3223.39,3233.18 ccw(c2774.84,4334.91) 3964.32,4347.04 3963.94,4491.41 3963.67,4495.75 cw(c4253.18,4513.93) 4253.18,4804 4421.66,4804 ccw(c4421.66,4842.69) 4460.35,4842.69 v1(4460.35,5272.1)
bpfOUT_7: C60.2 C61.1 J21.1 R96.2 R97.2 SB07.1 SB72.2 SB107.1 U10.8 | length 8425.1
  Top Layer w10: SB72.2@1127.18,121 U10.8@1234.86,121 cw(c1136.87,121) 1233.98,107.93 cw(c1136.87,121) 1218.01,66.06 cw(c1136.87,121) 1206.16,51.71 R97.2@1200.45,46 1204.12,42.33 1204.12,0.67 1200.45,-3 1204.63,-7.18 v1(1204.63,-75)
  Top Layer w11: SB107.1@4419.21,5246.85 v1(4419.21,5272.1) SB07.1@4419.21,5297.35
  Top Layer w15: SB72.2@1127.18,121 1127.18,175.36 C60.2@1122.67,179.88 1175.67,179.88 cw(c1175.67,178.88) R96.2@1176.67,178.88
  Bottom Layer w12: v1(1204.63,-75) ccw(c1238.43,-41.2) 1238.43,-89 1357.36,-89 ccw(c1340.23,96.8) 1526.26,82.42 1526.26,521.45 ccw(c1429.86,521.45) 1498.02,589.61 v1(1485.63,602) ccw(c1433.69,550.06) 1433.69,623.52 1387.83,623.52 cw(c1387.83,645.71) 1365.63,645.71 1365.63,678.83 ccw(c1343.23,678.83) 1343.23,701.24 1268.77,701.24 1268.38,701.24 cw(c1281.17,896.97) 1143.39,757.35 1142.16,758.56 cw(c1285.14,911.71) 1075.64,913.16 cw(c1285.83,919.08) 1137.19,1067.81 1221.21,1151.84 ccw(c1150.88,1222.17) 1250.35,1222.17 1250.35,2180.89 cw(c3787.55,2184.68) 3769.03,4721.82 3852.23,4721.82 ccw(c3852.23,4821.82) 3933.67,4763.79 ccw(c3852.23,4821.82) 3952.23,4821.82 3952.23,4831.2 cw(c4036.8,4831.2) 3977,4891 cw(c4047.01,4820.99) 4047.01,4920 4369,4920 ccw(c4369,4970.21) 4419.21,4970.21 v1(4419.21,5272.1)
bpfOUT_8: C68.2 C69.1 J24.1 R109.2 R110.2 SB08.1 SB82.2 SB108.1 U11.8 | length 8968.3
  Top Layer w10: SB82.2@558.2,121 U11.8@665.88,121 cw(c567.89,121) 665.01,107.93 cw(c567.89,121) 649.03,66.06 cw(c567.89,121) 637.18,51.71 R110.2@631.47,46 635.14,42.33 635.14,0.67 631.47,-3 635.65,-7.18 v1(635.65,-75)
  Top Layer w11: SB108.1@4378.06,5246.85 v1(4378.06,5272.1) SB08.1@4378.06,5297.35
  Top Layer w15: SB82.2@558.2,121 558.2,175.36 C68.2@553.69,179.88 606.69,179.88 cw(c606.69,178.88) R109.2@607.69,178.88
  Bottom Layer w12: v1(635.65,-75) ccw(c669.45,-41.2) 669.45,-89 788.38,-89 ccw(c771.25,96.8) 957.28,82.42 957.28,521.45 ccw(c860.88,521.45) 929.05,589.61 v1(916.65,602) ccw(c864.71,550.06) 864.71,623.52 818.85,623.52 cw(c818.85,645.71) 796.65,645.71 796.65,678.83 ccw(c774.25,678.83) 774.25,701.24 699.8,701.24 699.4,701.24 cw(c712.19,896.97) 574.42,757.35 573.19,758.56 cw(c716.16,911.71) 506.66,913.16 cw(c716.86,919.08) 568.21,1067.81 652.35,1151.95 ccw(c581.63,1222.66) 681.63,1222.66 681.63,2365.78 cw(c3367.25,2364.27) 3368.75,5049.89 4320.89,5049.89 ccw(c4320.89,5107.06) 4378.06,5107.06 v1(4378.06,5272.1)
DRL: J1.2 R12.2 R115.1 SB11.2 SB13.2 | length 2170.6
  Top Layer w10: v1(8306,401.46) SB13.2@8306,467.64 ; v1(8334.74,1079.6) 8388.4,1079.6 cw(c8388.4,1059) 8409,1059 8409,950 ccw(c8427.47,950) 8427.47,931.53 R115.1@8512.96,931.53 ; SB11.2@8370.52,751.97 8407.52,751.97 ; 8393.16,751.97 cw(c8393.16,736.97) 8408.16,736.97 cw(c8423.16,736.97) 8423.16,751.97 ; v1(8408.16,690.31) 8408.16,750.42 ccw(c8405.97,750.42) 8407.52,751.97 ; J1.2@8512.96,751.97 8407.52,751.97 ; R12.2@8667.85,158 8681.82,158 ccw(c8681.82,177.7) 8701.52,177.7 v1(8701.52,247.87)
  Bottom Layer w12: 8277.47,690.31 8297.47,690.31 ; v1(8334.74,1079.6) ccw(c8483.39,930.86) 8274.76,957.2 8274.76,713.02 ; v1(8408.16,690.31) 8297.47,690.31 ; v1(8701.52,247.87) 8701.52,323.48 ccw(c8670,323.48) 8670,355 8475.21,355 cw(c8475.21,400.14) 8443.21,368.3 8419.94,391.57 ccw(c8395.83,367.46) 8394.46,401.53 8392.76,401.46 v1(8306,401.46) 8285,401.46 cw(c8285,411.7) 8274.76,411.7 8274.76,667.61 ; 8274.76,667.61 cw(c8297.47,667.61) 8297.47,690.31 ; 8274.76,667.61 8274.76,713.02 ; 8274.76,713.02 ccw(c8297.47,713.02) 8297.47,690.31
DRL-5: J14.2 R74.2 R115.2 R116.2 R117.2 R118.2 R119.2 R120.2 R121.2 SB51.2 SB53.2 SB56.2 | length 44958.4
  Top Layer w10: v1(4124.9,401.46) SB56.2@4124.9,467.64 ; SB51.2@4189.42,751.97 4212.06,751.97 ; v1(4227.06,690.32) 4227.06,736.97 ; J14.2@4331.86,751.97 4242.06,751.97 ; R74.2@4486.75,158 4500.72,158 ccw(c4500.72,177.7) 4520.42,177.7 v1(4520.42,247.87) ; 4212.06,751.97 cw(c4212.06,736.97) 4227.06,736.97 ; 4212.06,751.97 4226.42,751.97 ; 4226.42,751.97 cw(c4224.87,750.42) 4227.06,750.42 4227.06,736.97 ; 4226.42,751.97 4242.06,751.97 ; 4227.06,736.97 cw(c4242.06,736.97) 4242.06,751.97
  Top Layer w12: R121.2@719.11,986.76 ccw(c724.9,986.76) R121.2@720.81,982.67 ; R121.2@719.11,991.53 680.53,991.53 cw(c680.53,1016.93) 655.12,1016.93 655.12,1099.89 cw(c766.96,1099.89) 694.19,1184.83 ccw(c632.97,1246.05) 719.55,1246.05 719.55,2365.89 cw(c3353.65,2363.78) 3355.75,4997.89 3900.75,4997.89 cw(c3900.75,4955.64) 3943,4955.64 3943,4690.84 ; R120.2@1288.09,986.76 ccw(c1293.88,986.76) R120.2@1289.79,982.67 ; R120.2@1288.09,991.53 1249.5,991.53 cw(c1249.5,1016.93) 1224.1,1016.93 1224.1,1099.89 cw(c1335.94,1099.89) 1251.31,1173.02 1259.24,1180.94 ccw(c1188.53,1251.65) 1261.96,1183.77 ccw(c1188.53,1251.65) 1275.43,1202.18 ccw(c1188.53,1251.65) 1288.53,1251.65 1288.53,2181.3 cw(c3774.43,2183.98) 3771.75,4669.89 3922.04,4669.89 ; R119.2@2387.87,986.76 ccw(c2393.66,986.76) R119.2@2389.57,982.67 ; R119.2@2387.87,991.53 2349.29,991.53 cw(c2349.29,1016.93) 2323.88,1016.93 2323.88,1099.89 cw(c2435.72,1099.89) 2351.1,1173.02 2359.24,1181.16 ccw(c2288.53,1251.87) 2361.83,1183.85 ccw(c2288.53,1251.87) 2371.7,1196.36 ccw(c2288.53,1251.87) 2388.53,1251.87 2388.53,2001.92 cw(c3618.61,2017.77) 3221.68,3182.17 ccw(c2773.44,4328.26) 4004.05,4335.57 4004.05,4591.68 ; 3943,4648.93 ccw(c3922.04,4648.93) 3922.04,4669.89 ; v1(4153.64,1079.6) 4175.08,1082.27 ccw(c4154.21,1250.19) 4273.86,1130.54 ccw(c4163.31,1241.08) 4319.65,1241.08 4319.65,4591.68 ; v1(4170.45,-56) SB53.2@4170.45,-7.18 ; 5065.64,4653.34 ccw(c5079.07,4659.78) 5079.07,4644.89 ; R118.2@6293.52,986.76 ccw(c6299.31,986.76) R118.2@6295.22,982.67 ; R118.2@6293.52,991.53 6254.93,991.53 cw(c6254.93,1016.93) 6229.53,1016.93 6229.53,1099.89 cw(c6341.37,1099.89) 6268.6,1184.83 ccw(c6208.58,1244.84) 6293.46,1244.84 6293.46,2004.87 ccw(c5029.58,1990.05) 5438.51,3186.03 cw(c5915.94,4331.13) 4675.35,4341.83 4675.35,4591.68 ; R117.2@7106.24,986.76 ccw(c7112.02,986.76) R117.2@7107.93,982.66 ; R117.2@7106.24,991.52 7067.65,991.52 cw(c7067.65,1016.93) 7042.24,1016.93 7042.24,1099.89 cw(c7154.08,1099.89) 7081.31,1184.82 ccw(c7022.85,1243.29) 7105.53,1243.29 7105.53,1971.47 ccw(c5867.77,1967.36) 6038.04,3193.36 cw(c6249.93,4406.58) 5018.59,4430.5 5018.59,4592.27 ; 7842.91,2074.12 7842.91,2030.92 7842.97,2030.92 7842.97,1244.95 cw(c7757.93,1244.95) 7818.06,1184.83 ccw(c7890.83,1099.89) 7778.99,1099.89 7778.99,1016.93 ccw(c7804.4,1016.93) 7804.4,991.53 R116.2@7842.98,991.53 ; R116.2@7842.98,986.76 ccw(c7848.77,986.76) R116.2@7844.68,982.67 ; 7842.96,2059.89 ccw(c5255.36,2057.28) 5252.76,4644.89 5079.07,4644.89 ; R115.2@8512.46,986.76 ccw(c8518.25,986.76) R115.2@8514.15,982.67 ; R115.2@8512.46,991.53 8473.87,991.53 cw(c8473.87,1016.93) 8448.46,1016.93 8448.46,1099.89 cw(c8560.31,1099.89) 8487.54,1184.82 ccw(c8412.46,1250.88) 8509.2,1225.57 ccw(c8412.46,1250.88) 8512.46,1250.88 8512.46,1869.89 ccw(c5374.11,1867.53) 5371.75,5005.89 5108.05,5005.89 ccw(c5108.05,4963.64) 5065.81,4963.64 5065.81,4639.49 cw(c5037.32,4639.49) 5065.64,4636.43 ; 3922.04,4669.89 ccw(c3922.04,4690.84) 3943,4690.84 ; 3943,4690.84 3943,4652.73 ccw(c3984.73,4652.73) 3984.73,4611 ; 3984.73,4611 cw(c3984.73,4591.68) 4004.05,4591.68 ; 3984.73,4611 4023.36,4611 ; 4004.05,4591.68 cw(c4023.36,4591.68) 4023.36,4611 ; 4023.36,4611 4300.34,4611 ; 4300.34,4611 cw(c4300.34,4591.68) 4319.65,4591.68 ; 4300.34,4611 4338.97,4611 ; 4319.65,4591.68 cw(c4338.97,4591.68) 4338.97,4611 ; 4338.97,4611 4656.03,4611 ; 4656.03,4611 cw(c4656.03,4591.68) 4675.35,4591.68 ; 4656.03,4611 4694.67,4611 ; 4675.35,4591.68 cw(c4694.67,4591.68) 4694.67,4611 ; 4694.67,4611 4999.86,4611 ; 4999.86,4611 cw(c4999.86,4592.27) 5018.59,4592.27 ; 4999.86,4611 5037.32,4611 ; 5018.59,4592.27 cw(c5037.32,4592.27) 5037.32,4611 ; 5037.32,4611 ccw(c5037.32,4639.49) 5064.18,4630 ccw(c5037.32,4639.49) 5065.64,4636.43 ; 5065.64,4636.43 cw(c5079.07,4630) 5079.07,4644.89
  Bottom Layer w12: 4096.37,690.32 4116.37,690.32 ; v1(4153.64,1079.6) ccw(c4302.29,930.86) 4093.66,957.2 4093.66,713.02 ; v1(4170.45,-56) 4170.45,-75.43 ccw(c4183.91,-75.43) 4183.91,-88.9 4482.21,-88.9 ccw(c4482.21,-24.72) 4546.39,-24.72 4546.39,186.18 ccw(c4460.13,186.18) v1(4520.42,247.87) 4520.42,323.48 ccw(c4488.9,323.48) 4488.9,355 4294.11,355 cw(c4294.11,400.14) 4262.11,368.3 4238.84,391.57 ccw(c4214.73,367.46) 4213.35,401.53 4211.66,401.46 v1(4124.9,401.46) 4103.9,401.46 cw(c4103.9,411.7) 4093.66,411.7 4093.66,667.61 ; v1(4227.06,690.32) 4116.37,690.32 ; 4093.66,667.61 cw(c4116.37,667.61) 4116.37,690.32 ; 4093.66,667.61 4093.66,713.02 ; 4093.66,713.02 ccw(c4116.37,713.02) 4116.37,690.32
DRL_2: J5.2 R35.2 R116.1 SB21.2 SB23.2 | length 2170.6
  Top Layer w10: v1(7636.53,401.46) SB23.2@7636.53,467.64 ; v1(7665.27,1079.6) 7718.92,1079.6 cw(c7718.92,1059) 7739.53,1059 7739.53,950 ccw(c7758,950) 7758,931.53 R116.1@7843.49,931.53 ; SB21.2@7701.04,751.97 7738.04,751.97 ; 7723.68,751.97 cw(c7723.68,736.97) 7738.68,736.97 cw(c7753.68,736.97) 7753.68,751.97 ; v1(7738.68,690.32) 7738.68,750.42 ccw(c7736.49,750.42) 7738.04,751.97 ; J5.2@7843.49,751.97 7738.04,751.97 ; R35.2@7998.37,158 8012.35,158 ccw(c8012.35,177.7) 8032.05,177.7 v1(8032.05,247.87)
  Bottom Layer w12: 7608,690.32 7628,690.32 ; v1(7665.27,1079.6) ccw(c7813.91,930.86) 7605.29,957.2 7605.29,713.02 ; v1(7738.68,690.32) 7628,690.32 ; v1(8032.05,247.87) 8032.05,323.48 ccw(c8000.53,323.48) 8000.53,355 7805.74,355 cw(c7805.73,400.14) 7773.73,368.3 7750.47,391.57 ccw(c7726.35,367.46) 7724.98,401.53 7723.29,401.46 v1(7636.53,401.46) 7615.53,401.46 cw(c7615.53,411.7) 7605.29,411.7 7605.29,667.61 ; 7605.29,667.61 cw(c7628,667.61) 7628,690.32 ; 7605.29,667.61 7605.29,713.02 ; 7605.29,713.02 ccw(c7628,713.02) 7628,690.32
DRL_3: J8.2 R48.1 R117.1 SB31.2 SB33.2 | length 2170.6
  Top Layer w10: v1(6899.78,401.46) SB33.2@6899.78,467.64 ; v1(6928.52,1079.6) 6982.18,1079.6 cw(c6982.18,1058.99) 7002.78,1058.99 7002.78,949.99 ccw(c7021.25,949.99) 7021.25,931.52 R117.1@7106.74,931.52 ; SB31.2@6964.29,751.96 7001.29,751.96 ; 6986.93,751.96 cw(c6986.93,736.96) 7001.93,736.96 cw(c7016.93,736.96) 7016.93,751.96 ; v1(7001.93,690.31) 7001.93,750.41 ccw(c6999.74,750.41) 7001.29,751.96 ; J8.2@7106.74,751.96 7001.29,751.96 ; R48.1@7261.62,157.99 7275.6,157.99 ccw(c7275.6,177.7) 7295.3,177.7 v1(7295.3,247.87)
  Bottom Layer w12: 6871.25,690.31 6891.25,690.31 ; v1(6928.52,1079.6) ccw(c7077.16,930.86) 6868.54,957.2 6868.54,713.02 ; v1(7001.93,690.31) 6891.25,690.31 ; v1(7295.3,247.87) 7295.3,323.47 ccw(c7263.78,323.47) 7263.78,354.99 7068.99,354.99 cw(c7068.99,400.14) 7036.99,368.3 7013.72,391.56 ccw(c6989.6,367.45) 6988.23,401.53 6986.54,401.46 v1(6899.78,401.46) 6878.78,401.46 cw(c6878.78,411.69) 6868.54,411.69 6868.54,667.6 ; 6868.54,667.6 cw(c6891.25,667.6) 6891.25,690.31 ; 6868.54,667.6 6868.54,713.02 ; 6868.54,713.02 ccw(c6891.25,713.02) 6891.25,690.31
DRL_4: J11.2 R61.2 R118.1 SB41.2 SB43.2 | length 2170.6
  Top Layer w10: v1(6087.06,401.46) SB43.2@6087.06,467.64 ; v1(6115.81,1079.6) 6169.46,1079.6 cw(c6169.46,1059) 6190.06,1059 6190.06,950 ccw(c6208.54,950) 6208.54,931.53 R118.1@6294.03,931.53 ; SB41.2@6151.58,751.97 6188.58,751.97 ; 6174.22,751.97 cw(c6174.22,736.97) 6189.22,736.97 cw(c6204.22,736.97) 6204.22,751.97 ; v1(6189.22,690.31) 6189.22,750.42 ccw(c6187.03,750.42) 6188.58,751.97 ; J11.2@6294.03,751.97 6188.58,751.97 ; R61.2@6448.91,158 6462.89,158 ccw(c6462.89,177.7) 6482.59,177.7 v1(6482.59,247.87)
  Bottom Layer w12: 6058.54,690.31 6078.54,690.31 ; v1(6115.81,1079.6) ccw(c6264.45,930.86) 6055.83,957.2 6055.83,713.02 ; v1(6189.22,690.31) 6078.54,690.31 ; v1(6482.59,247.87) 6482.59,323.48 ccw(c6451.06,323.48) 6451.06,355 6256.27,355 cw(c6256.27,400.14) 6224.27,368.3 6201.01,391.57 ccw(c6176.89,367.46) 6175.52,401.53 6173.82,401.46 v1(6087.06,401.46) 6066.06,401.46 cw(c6066.06,411.7) 6055.83,411.7 6055.83,667.61 ; 6055.83,667.61 cw(c6078.54,667.61) 6078.54,690.31 ; 6055.83,667.61 6055.83,713.02 ; 6055.83,713.02 ccw(c6078.54,713.02) 6078.54,690.31
DRL_6: J17.2 R87.2 R119.1 SB61.2 SB63.2 | length 2170.6
  Top Layer w10: v1(2181.41,401.46) SB63.2@2181.41,467.64 ; v1(2210.16,1079.6) 2263.81,1079.6 cw(c2263.81,1059) 2284.41,1059 2284.41,950 ccw(c2302.89,950) 2302.89,931.53 R119.1@2388.38,931.53 ; SB61.2@2245.93,751.97 2282.93,751.97 ; 2268.57,751.97 cw(c2268.57,736.97) 2283.57,736.97 cw(c2298.57,736.97) 2298.57,751.97 ; v1(2283.57,690.31) 2283.57,750.42 ccw(c2281.38,750.42) 2282.93,751.97 ; J17.2@2388.38,751.97 2282.93,751.97 ; R87.2@2543.26,158 2557.24,158 ccw(c2557.24,177.7) 2576.94,177.7 v1(2576.94,247.87)
  Bottom Layer w12: 2152.89,690.31 2172.89,690.31 ; v1(2210.16,1079.6) ccw(c2358.8,930.86) 2150.18,957.2 2150.18,713.02 ; v1(2283.57,690.31) 2172.89,690.31 ; v1(2576.94,247.87) 2576.94,323.48 ccw(c2545.41,323.48) 2545.41,355 2350.63,355 cw(c2350.62,400.14) 2318.62,368.3 2295.36,391.57 ccw(c2271.24,367.46) 2269.87,401.53 2268.18,401.46 v1(2181.41,401.46) 2160.41,401.46 cw(c2160.41,411.7) 2150.18,411.7 2150.18,667.61 ; 2150.18,667.61 cw(c2172.89,667.61) 2172.89,690.31 ; 2150.18,667.61 2150.18,713.02 ; 2150.18,713.02 ccw(c2172.89,713.02) 2172.89,690.31